# Altium PCB Janus.PcbDoc
Units mm, origin at the board's own origin, x right, y up, seen from the top; angles counter-clockwise.
Board outline 55 x 35 mm, 2 copper layers (Top Layer, Bottom Layer); 88 components, 54 nets, 312 pads, 95 vias.
Unrouted connection lines stored in the file: 149.
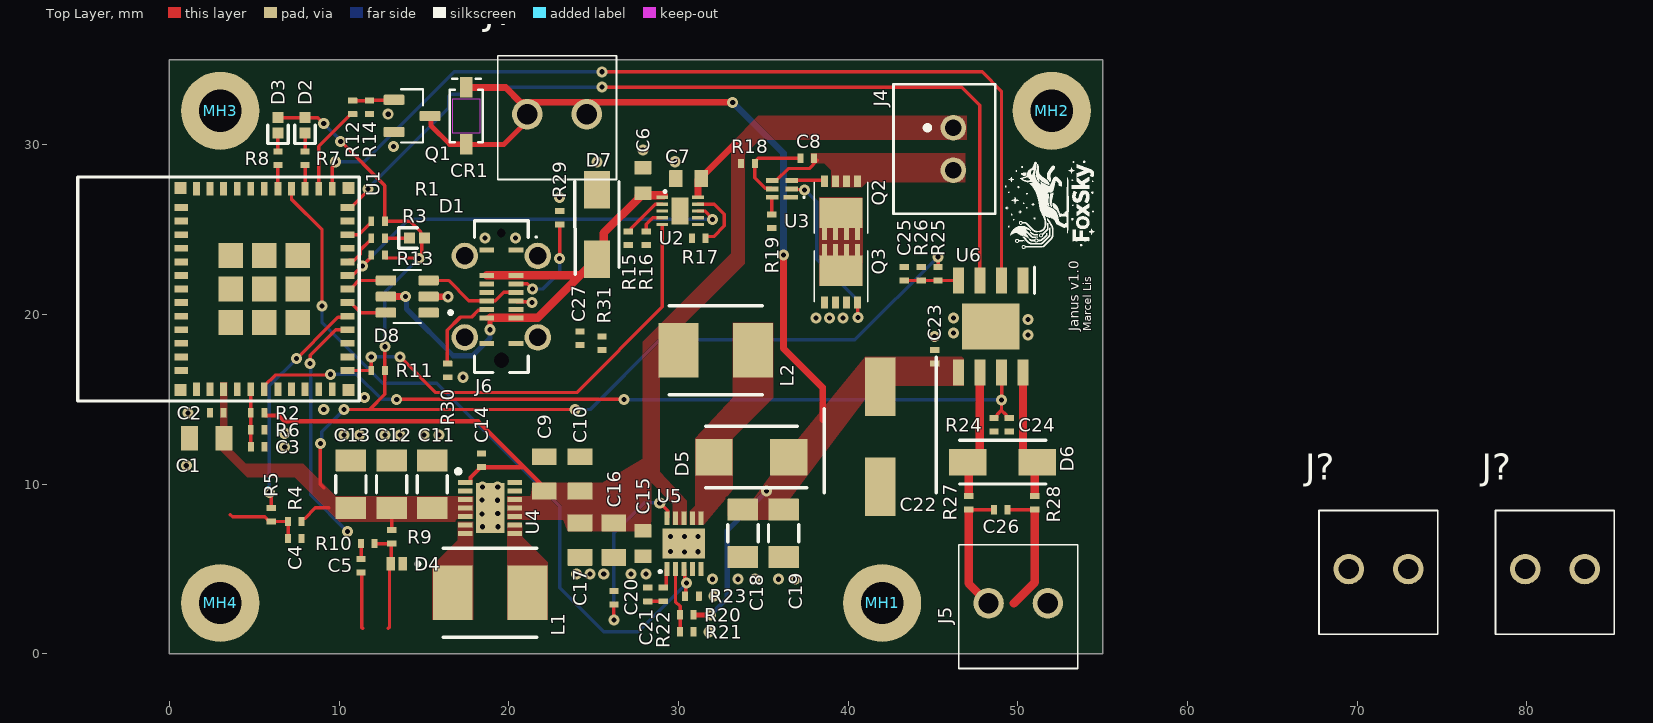
[diagram p0: Top Layer view]
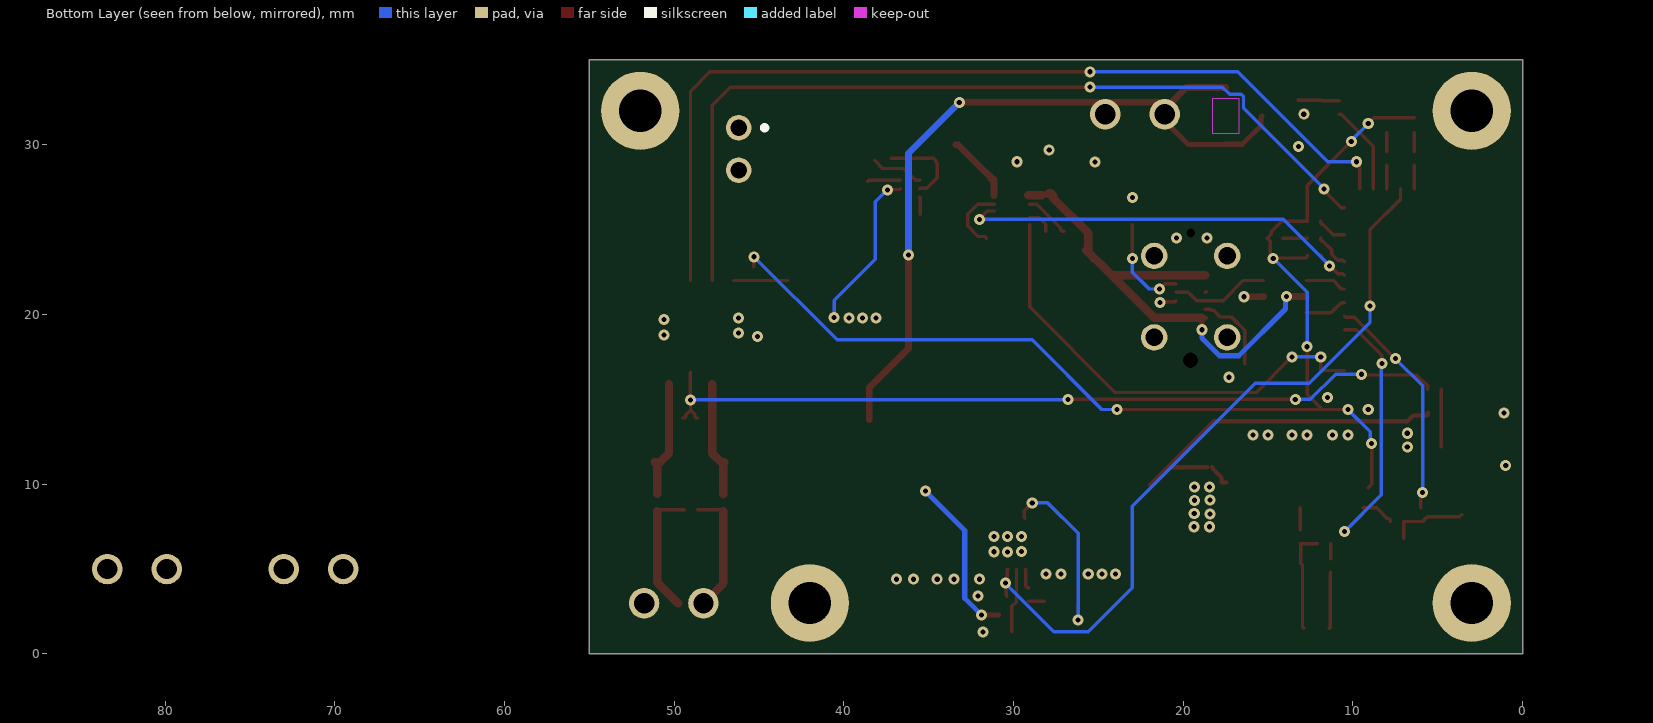
[diagram p1: Bottom Layer view, seen from below]
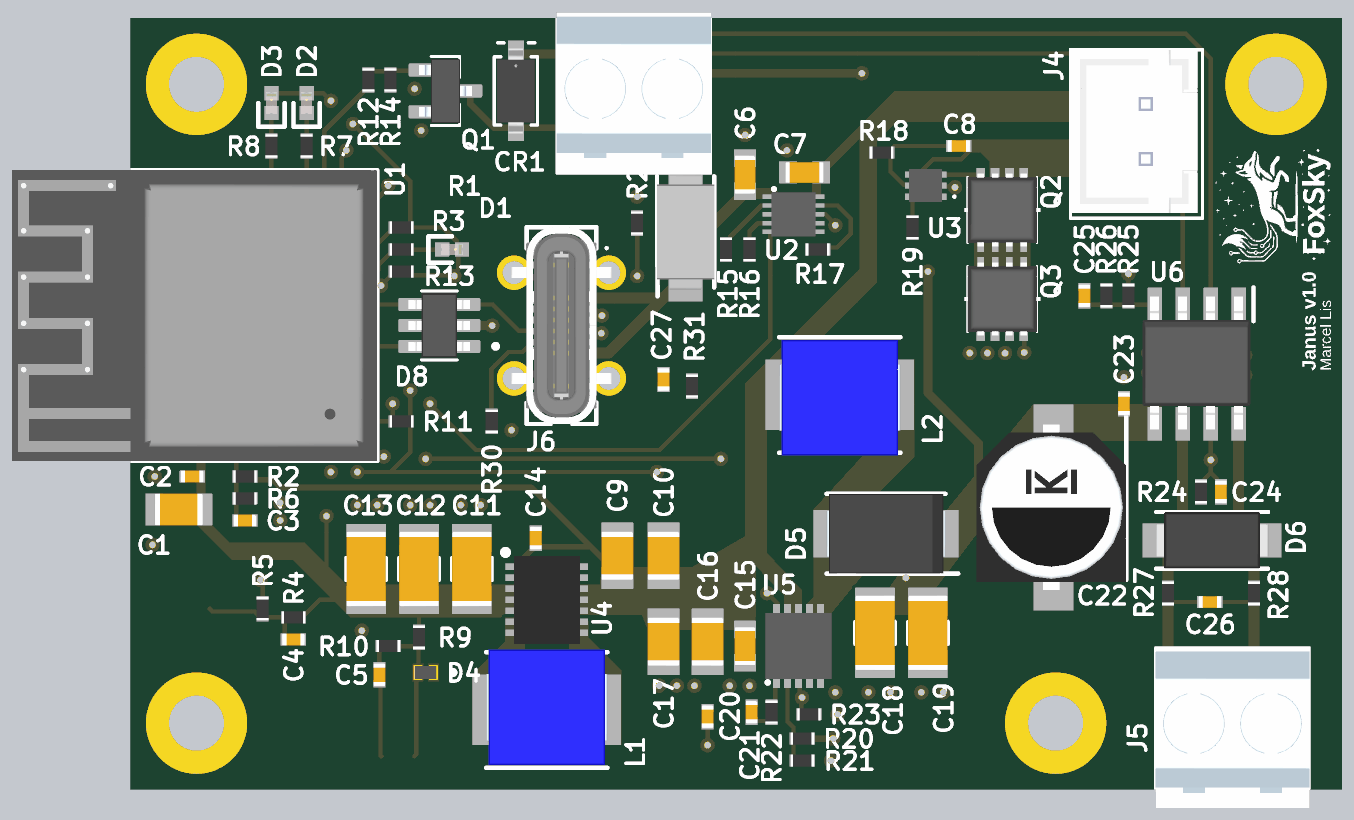
[diagram p2: 3D render of the assembled board from above, using the file's embedded part models]

## Layer stack, top to bottom
Top Solder: solder mask 0.0102, Solder Resist, Dk 3.5
Top Layer: signal copper 0.0356
Dielectric 1: dielectric 0.32, FR-4, Dk 4.8
Bottom Layer: signal copper 0.0356
Bottom Solder: solder mask 0.0102, Solder Resist, Dk 3.5

## Board outline
0,0 0,35 55,35 55,0

## Design rules (kind name [scope] priority, off if disabled: settings)
Clearance [All] p1: gap=0.15 ignorepadtopadclearanceinfootprint=TRUE
ComponentClearance [All] p1: gap=0.01 collisioncheckmode=3 verticalgap=0.01 showdistances=FALSE
DiffPairsRouting [All] p1: maxlimit=0.254 minlimit=0.254 mostfreqgap=0.254 toplayer_minwidth=0.381 toplayer_maxwidth=0.381 toplayer_prefwidth=0.381 bottomlayer_minwidth=0.381 bottomlayer_maxwidth=0.381 bottomlayer_prefwidth=0.381 maxuncoupledlength=12.7
PolygonConnect [All] p1: connectstyle=Direct reliefconductorwidth=0.254 reliefentries=4 polygonreliefangle="90 Angle" airgapwidth=0.254
RoutingVias [All] p1: holewidth=0.3 width=0.65 viastyle="Through Hole" minholewidth=0.3 minwidth=0.65 maxholewidth=0.3 maxwidth=0.65
SilkToSilkClearance [All] p1: silktosilkclearance=0.15
SolderMaskExpansion ViaTenting [IsVia] p1: expansion=0 istentingtop=TRUE
SolderMaskExpansion [All] p2: expansion=0 istentingtop=FALSE
SupplyNets "Schematic Supply Nets_5" [InNet('+3V3')] p1: voltage=0.000
SupplyNets "Schematic Supply Nets_4" [InNet('CELL-')] p2: voltage=0.000
SupplyNets "Schematic Supply Nets_3" [InNet('GND')] p3: voltage=0.000
SupplyNets "Schematic Supply Nets_2" [InNet('+12V')] p4: voltage=0.000
SupplyNets "Schematic Supply Nets_1" [InNet('CELL+')] p5: voltage=0.000
SupplyNets "Schematic Supply Nets" [InNet('+V_USB')] p6: voltage=0.000
Width [All] p1: maxlimit=0.6 minlimit=0.2 preferedwidth=0.2 minimp=50.000000 maximp=50.000000 favimp=50.000000
27 further rules are at their usual default settings.

## Classes and differential pairs
component class FoxSky.Janus: MH1 MH2 MH3 MH4
component class USBC_CONNECTOR: C27 D7 D8 J6 R29 R30 R31
component class POWER_SUPPLY: C9 C10 C11 C12 C13 C14 C15 C16 C17 C18 C19 C20 C21 D5 L1 L2 R20 R21 R22 R23 U4 U5
component class POWER_CELL_PROTECTION_AND_CHARGING: C6 C7 C8 J4 Q2 Q3 R15 R16 R17 R18 R19 U2 U3
component class MOTOR_DRIVER: C22 C23 C24 C25 C26 D6 J5 R24 R25 R26 R27 R28 U6
component class MCU: C1 C2 C3 C4 C5 CR1 D1 D2 D3 D4 J? Q1 R1 R2 R3 R4 R5 R6 R7 R8 R9 R10 R11 R12 R13 R14 U1
differential pair USB: +USB_P -USB_N

## Components (designator, comment, footprint, x,y, rotation, side; value= is the part's Value field where it differs from the comment)
C1 "10u" C0805 2.2,12.7 r0 top
C2 "100n" C0402 2.8,14.2 r0 top
C3 "100n" C0402 5.2,12.2 r180 top
C4 "100n" C0402 7.4,6.8 r180 top
C5 "10n" C0402 11.3,5.2 r90 top
C6 "1u" C0603 27.9,27.9 r270 top
C7 "1u" C0603 30.6,28 r0 top
C8 "100n" C0402 37.6,29.2 r180 top
C9 "10u" C0805 22.1,10.6 r270 top
C10 "10u" C0805 24.2,10.6 r270 top
C11 "22u" C1206 15.5,10 r270 top
C12 "22u" C1206 13.1,10 r270 top
C13 "22u" C1206 10.7,10 r270 top
C14 "100n" C0402 18.4,11.4 r270 top
C15 "1u" C0603 27.9,6.5 r90 top
C16 "10u" C0805 26.2,6.7 r90 top
C17 "10u" C0805 24.2,6.7 r90 top
C18 "22u" C1206 33.8,7.1 r90 top
C19 "22u" C1206 36.2,7.1 r90 top
C20 "100n" C0402 26.2,3.3 r270 top
C21 "1n2" C0402 28.2,3.5 r270 top
C22 "100u" CAPAE660X800N 41.9,12.8 r270 top
C23 "100n" C0402 45.1,17.5 r270 top
C24 "10n" C0402 49.5,13.5 r90 top
C25 "100n" C0402 43.3,22.4 r270 top
C26 "100n" C0402 49,8.5 r180 top
C27 "10n" C0402 24.2,18.6 r270 top
CR1 "1N4148W-E3-08" CR_48W-E3-08_VIS 17.5,31.7 r270 top
D1 "LED0402" LED0402 14.6,24.5 r0 top
D2 "LED0402" LED0402 8,31.15 r90 top
D3 "LED0402" LED0402 6.4,31.15 r90 top
D4 "PESD5V0V1BL_315" DIO_PESD5V0S1UL,315 13.4,5.3 r180 top
D5 "SS24-E3_52T" DIOM5436X244N 34.3,11.6 r180 top
D6 "SMAJ15CA" DIONM5126X265N 49.1,11.3 r180 top
D7 "SMAJ5.0A" DIOM5026X229N 25.2,25.3 r90 top
D8 "USBLC6-2SC6" SOT95P280X145-6N 14.022,21.054 r180 top
J4 "B2B-XH-A" CONN_B2B-XH-A_JST 46.2,31 r90 top
J5 "1546551-2" 15465512 48.274,2.983 r0 top
J6 "USB4215-03-A" USB496000C 19.565,21.05 r270 top locked
J? "1546551-2" 15465512 69.5,5 r0 top
J? "1546551-2" 15465512 21.1,31.8 r0 top
J? "1546551-2" 15465512 79.9,5 r0 top
L1 "SRP5030WA-1R5M" INDPM5552X300N 18.9,3.6 r180 top
L2 "SRP5030WA-3R3M" INDPM5552X300N 32.2,17.9 r0 top
MH1 "M2 Plated Hole" "M2 Plated Hole"#1 54.4,3.1 r0 top
MH2 "M2 Plated Hole" "M2 Plated Hole"#2 52.7,32 r0 top
MH3 "M2 Plated Hole" "M2 Plated Hole"#3 3,32.4 r0 top
MH4 "M2 Plated Hole" "M2 Plated Hole"#4 2.8,2.8 r0 top
Q1 "AO3400" SOT95P240X111-3N 14.3,31.7 r0 top
Q2 "CSD17581Q3A" CSD17581Q3A 39.575,26.447 r270 top
Q3 "CSD17581Q3A" CSD17581Q3A 39.575,22.102 r90 top
R1 "330R" R0402 12.3,24.5 r180 top
R2 "1M" R0402 5.2,14.2 r0 top
R3 "10k" R0402 12.3,25.5 r180 top
R4 "10k" R0402 7.4,7.8 r0 top
R5 "1k" R0402 6,8.2 r90 top
R6 "1M" R0402 5.2,13.2 r180 top
R7 "330R" R0402 8,29.2 r270 top
R8 "330R" R0402 6.4,29.2 r270 top
R9 "1M" R0402 13.1,6.9 r270 top
R10 "10k" R0402 11.7,6.5 r0 top
R11 "100k" R0402 12.3,16.7 r180 top
R12 "100R" R0402 10.8,32.2 r90 top
R13 "100k" R0402 12.3,23.5 r180 top
R14 "100k" R0402 11.8,32.2 r270 top
R15 "1k" R0402 27.042,24.5 r90 top
R16 "2k" R0402 28.1,24.5 r90 top
R17 "10k" R0402 31.2,24.5 r0 top
R18 "330R" R0402 34.1,28.9 r180 top
R19 "2k2" R0402 35.5,25.5 r90 top
R20 "158k" R0402 30.5,2.3 r0 top
R21 "18k" R0402 30.5,1.3 r180 top
R22 "68k" R0402 29.1,3.5 r90 top
R23 "100k" R0402 30.8,3.4 r180 top
R24 "2k87" R0402 48.6,13.5 r90 top
R25 "100k" R0402 45.3,22.4 r90 top
R26 "361k" R0402 44.3,22.4 r270 top
R27 "0R" R0402 47.1,8.9 r270 top
R28 "0R" R0402 51,8.9 r270 top
R29 "5k1" R0402 23,25.7 r270 top
R30 "5k1" R0402 16.4,16.7 r90 top
R31 "1M" R0402 25.5,18.3 r270 top
U1 "ESP32-C6-MINI-1-H8" ESP32C6MINI1H8 2.9,21.5 r90 top
U2 "BQ24040DSQT" SON40P200X200X80-11N 30.1,26.1 r0 top
U3 "BQ29728DSER" TPS610985DSET 36.1,27.4 r90 top
U4 "TPS63021DSJR" SON50P300X400X100-15N-D 18.9,8.6 r0 top
U5 "TPS61087DSCR" SON50P300X300X80-11N-D 30.325,6.499 r90 top
U6 "DRV8251ADDAR" SOIC127P600X170-9N 48.4,19.3 r270 top

## Footprints (in the part's own frame and the unit in brackets; to place one, negate y for a bottom-side part, rotate by r counter-clockwise, add the part's x,y. Pads: shape width x height; smd on the part's side, far side on the other; paste and mask are expansions set on the pad)
15465512 [mm]
  round 1.8 hole 1.2: 1(0,0) 2(3.5,0)
  silkscreen extent -1.75,-3.85 5.25,3.45, body extent -1.75,-3.85 5.25,3.45, height 8.51
C0402 [mm] "Generic 0402 SMD Ceramic Capacitor Footprint"
  rrect5% 0.355x0.55 smd: 1(-0.4,0) 2(0.4,0)
  body extent -0.53,-0.28 0.53,0.28, height 0.55
C0603 [mm] "Generic 0603 SMD Ceramic Capacitor Footprint"
  rrect5% 0.8x1 smd: 1(-0.75,0) 2(0.75,0)
  body extent -0.87,-0.48 0.87,0.48, height 0.95
C0805 [mm] "Generic 0805 SMD Ceramic Capacitor Footprint"
  rrect5% 1x1.45 smd: 1(-1.016,0) 2(1.016,0)
  body extent -1.1,-0.72 1.1,0.72, height 1.45
C1206 [mm] "Generic 1206 SMD Ceramic Capacitor Footprint"
  rrect5% 1.3x1.8 smd: 1(-1.4,0) 2(1.4,0)
  silkscreen extent -0.5,-0.89 0.5,0.89, body extent -1.7,-0.9 1.7,0.9, height 1.8
CAPAE660X800N [mm]
  rect 3.45x1.8 smd: 1(-2.95,0) 2(2.95,0)
  silkscreen extent -4.67,-3.3 3.3,3.3, body extent -3.75,-3.5 3.75,3.3, height 8.01
CONN_B2B-XH-A_JST [mil]
  round 59 hole 39 paste-99999 mask+0: 1(0,0) 2(-98.43,0)
  silkscreen extent -200,-97 101,139, body extent -191,-88 101,138, height 276
CR_48W-E3-08_VIS [mil]
  rect 47.56x28.36 smd paste+0 mask+0: 1(-66,0) 2(66,0)
  Keep-Out Layer region: -40.22,-31.5 -40.22,31.5 40.22,31.5 40.22,-31.5
  silkscreen extent -86,-39 61,39, body extent -76,-34 76,34, height 53
CSD17581Q3A [mm]
  rect 0.7x0.4 smd: 1(-1.402,0.975) 2(-1.402,0.325) 3(-1.402,-0.325) 4(-1.402,-0.975)
  rect 0.685x0.3 smd: 5(1.706,-0.975) 6(1.706,-0.325) 7(1.706,0.325) 8(1.706,0.975)
  rect 1.775x2.55 smd: 9(0.476,0)
  silkscreen extent -1.35,-1.58 1.65,1.58, body extent -1.5,-1.73 1.8,1.73, height 0.9
DIO_PESD5V0S1UL,315 [mm]
  rect 0.5x0.8 smd paste-0.1 mask+0: A(0.35,0) K(-0.35,0)
  silkscreen extent -1.35,-0.1 -1.15,0.1, body extent -0.49,-0.29 0.49,0.29, height 0.5
DIOM5026X229N [mm]
  rect 2.2x1.55 smd: 1(-2.05,0) 2(2.05,0)
  silkscreen extent -2.92,-1.3 2.52,1.3, body extent -2.61,-1.3 2.61,1.3, height 2.33
DIOM5436X244N [mm]
  rect 2.2x2.15 smd: 1(-2.2,0) 2(2.2,0)
  silkscreen extent -3.27,-1.81 2.7,1.81, body extent -2.7,-1.81 2.7,1.81, height 2.44
DIONM5126X265N [mm]
  rect 2.2x1.55 smd: 1(-2.05,0) 2(2.05,0)
  silkscreen extent -2.54,-1.29 2.54,1.29, body extent -2.55,-1.28 2.55,1.28, height 2.34
ESP32C6MINI1H8 [mm]
  rect 0.8x0.4 smd: 1(-5.9,1.3) 2(-5.9,0.5) 3(-5.9,-0.3) 4(-5.9,-1.1) 5(-5.9,-1.9) 6(-5.9,-2.7) 7(-5.9,-3.5) 8(-5.9,-4.3) 9(-5.9,-5.1) 10(-5.9,-5.9) 11(-5.9,-6.7) 25(5.9,-6.7) 26(5.9,-5.9) 27(5.9,-5.1) 28(5.9,-4.3) 29(5.9,-3.5) 30(5.9,-2.7) 31(5.9,-1.9) 32(5.9,-1.1) 33(5.9,-0.3) 34(5.9,0.5) 35(5.9,1.3)
  rect 0.4x0.8 smd: 12(-4.8,-7.6) 13(-4,-7.6) 14(-3.2,-7.6) 15(-2.4,-7.6) 16(-1.6,-7.6) 17(-0.8,-7.6) 18(0,-7.6) 19(0.8,-7.6) 20(1.6,-7.6) 21(2.4,-7.6) 22(3.2,-7.6) 23(4,-7.6) 24(4.8,-7.6) 36(4.8,2.2) 37(4,2.2) 38(3.2,2.2) 39(2.4,2.2) 40(1.6,2.2) 41(0.8,2.2) 42(0,2.2) 43(-0.8,2.2) 44(-1.6,2.2) 45(-2.4,2.2) 46(-3.2,2.2) 47(-4,2.2) 48(-4.8,2.2)
  rect 1.45x1.45 smd: 49(0,-2.7) 54(-1.975,-2.7) 55(-1.975,-4.675) 56(0,-4.675) 57(1.975,-4.675) 58(1.975,-2.7) 59(1.975,-0.725) 60(0,-0.725) 61(-1.975,-0.725)
  rect 0.7x0.7 smd: 50(5.95,2.25) 51(5.95,-7.65) 52(-5.95,-7.65) 53(-5.95,2.25)
  silkscreen extent -6.6,-8.3 6.6,8.3, body extent -6.6,-8.3 6.6,8.3, height 2.55
INDPM5552X300N [mm]
  rect 2.35x3.2 smd: 1(-2.2,0) 2(2.2,0)
  silkscreen extent -2.75,-2.63 2.75,2.63, body extent -2.75,-2.75 2.75,2.5, height 3
LED0402 [mm] "LED, 2-Leads, Body 1.00x0.50mm, IPC Medium Density"
  rect 0.65x0.65 smd: A(0.45,0) K(-0.45,0)
  silkscreen extent -1.07,-0.6 0,0.6, body extent -0.5,-0.25 0.5,0.25, height 0.4
"M2 Plated Hole"#1 [mm]
  round 4.6 hole 2.5 mask+0: 1(-12.4,-0.1)
"M2 Plated Hole"#2 [mm]
  round 4.6 hole 2.5 mask+0: 1(-0.7,0)
"M2 Plated Hole"#3 [mm]
  round 4.6 hole 2.5 mask+0: 1(0,-0.4)
"M2 Plated Hole"#4 [mm]
  round 4.6 hole 2.5 mask+0: 1(0.2,0.2)
R0402 [mm] "Generic 0402 Resistor Footprint"
  rrect5% 0.35x0.55 smd: 1(-0.4,0) 2(0.4,0)
  body extent -0.53,-0.28 0.53,0.28, height 0.37
SOIC127P600X170-9N [mm]
  rect 1.525x0.65 smd: 1(-2.712,1.905) 2(-2.712,0.635) 3(-2.712,-0.635) 4(-2.712,-1.905) 5(2.712,-1.905) 6(2.712,-0.635) 7(2.712,0.635) 8(2.712,1.905)
  rect 2.71x3.4 smd: 9(0,0)
  silkscreen extent -3.47,2.58 -1.95,2.58, body extent -3.06,-2.46 2.96,2.44, height 1.57
SON40P200X200X80-11N [mm]
  rect 0.7x0.2 smd: 1(-1.05,0.8) 2(-1.05,0.4) 3(-1.05,0) 4(-1.05,-0.4) 5(-1.05,-0.8) 6(1.05,-0.8) 7(1.05,-0.4) 8(1.05,0) 9(1.05,0.4) 10(1.05,0.8)
  rect 1x1.6 smd: 11(0,0)
  silkscreen extent -0.9,1.13 -0.88,1.16, body extent -1,-1 1,1, height 0.8
SON50P300X300X80-11N-D [mm]
  rect 0.8x0.3 smd: 1(-1.5,1) 2(-1.5,0.5) 3(-1.5,0) 4(-1.5,-0.5) 5(-1.5,-1) 6(1.5,-1) 7(1.5,-0.5) 8(1.5,0) 9(1.5,0.5) 10(1.5,1)
  rect 1.75x2.5 smd: 11(0,0)
  silkscreen extent -1.68,1.37 -1.63,1.42, body extent -1.5,-1.5 1.5,1.5, height 0.8
SON50P300X400X100-15N-D [mm]
  rect 0.85x0.3 smd: 1(-1.45,1.5) 2(-1.45,1) 3(-1.45,0.5) 4(-1.45,0) 5(-1.45,-0.5) 6(-1.45,-1) 7(-1.45,-1.5) 8(1.45,-1.5) 9(1.45,-1) 10(1.45,-0.5) 11(1.45,0) 12(1.45,0.5) 13(1.45,1) 14(1.45,1.5)
  rect 1.68x2.95 smd: 15(0,0)
  silkscreen extent -2,2.03 -1.75,2.27, body extent -1.5,-2 1.5,2, height 1
SOT95P240X111-3N [mm]
  rrect25% 1.23x0.6 smd: 1(-1.06,0.95) 2(-1.06,-0.95) 3(1.06,0)
  silkscreen extent -0.65,-1.57 0.65,1.57, body extent -1.2,-1.45 1.2,1.45, height 1.11
SOT95P280X145-6N [mm]
  rrect25% 1.21x0.59 smd: 1(-1.255,0.95) 2(-1.255,0) 3(-1.255,-0.95) 4(1.255,-0.95) 5(1.255,0) 6(1.255,0.95)
  silkscreen extent -2.66,-1.57 0.81,1.57, body extent -1.4,-1.46 1.4,1.46, height 1.42
TPS610985DSET [mm]
  rect 0.28x0.85 smd: 1(-0.5,-0.525)
  rect 0.28x0.75 smd: 2(0,-0.575) 3(0.5,-0.575) 4(0.5,0.575) 5(0,0.575) 6(-0.5,0.575)
  silkscreen extent -0.55,-1.35 -0.45,-1.25, body extent -0.75,-0.75 0.75,0.75, height 0.79
USB496000C [mm]
  round 1.56 hole 1.04: 13(-2.4,2.15) 14(-2.4,-2.15) 15(2.4,2.15) 16(2.4,-2.15)
  rect 0.3x0.87 smd: A1/B12(-2.75,-0.865) A1/B12(-2.75,0.865) A4/B9(-1.25,0.865) A4/B9(-1.25,-0.865) A5(-0.75,0.865) A6(-0.25,0.865) A7(0.25,0.865) A8(0.75,0.865) B1/A12(2.75,-0.865) B1/A12(2.75,0.865) B4/A9(1.25,0.865) B4/A9(1.25,-0.865) B5(0.75,-0.865) B6(0.25,-0.865) B7(-0.25,-0.865) B8(-0.75,-0.865)
  round 0.26 hole 0.52 unplated: MH1(-3.75,0)
  round 0.445 hole 0.89 unplated: MH2(3.75,0)
  silkscreen extent -4.47,-1.58 4.47,2.1, body extent -4.47,-2.3 4.47,2.3, height 6.5

## Part data
C1 C9 C10 C16 C17: library part CMP-00025-5, "Generic 0805 SMD Ceramic Capacitor"
C2 C3 C4 C5 C8 C14 C20 C21 C23 C24 C25 C26 C27: library part CMP-00023-15, "Generic SMD 0402 Ceramic Capacitor"
C6 C7 C15: library part CMP-00024-8, "Generic 0603 SMD Ceramic Capacitor"
C11 C12 C13 C18 C19: library part CMP-00026-7, "Generic 1206 SMD Ceramic Capacitor"
C22: library part EDK107M025A9HAA, "Surface Mount, Aluminum Electrolytic", Manufacturer_Name="Yageo Group", Mouser Part Number=80-EDK107M025A9HAA, Datasheet Link=https://www.yageogroup.com/content/datasheet/asset/file/KEM_A4001_EDK, Geometry.Height=8mm, Manufacturer_Part_Number=EDK107M025A9HAA, Mouser Price/Stock=https://www.mouser.co.uk/ProductDetail/KEMET/EDK107M025A9HAA?qs=T9vdlufmP8yf8os%252BKCOQGA%3D%3D
CR1: "SWITCHING DIODE GENPURP SOD123_A", Manufacturer_Name=Vishay, Copyright="Copyright (C) 2026 Ultra Librarian. All rights reserved.", Manufacturer_Part_Number=1N4148W-E3-08
D1 D2 D3: library part CMP-021-000003-4
D4: "12.5V Clamp 4.8A (8/20µs) Ipp Tvs Diode Surface Mount DFN1006-2"
D5: "Schottky Diodes & Rectifiers 2.0 Amp 40 Volt", Manufacturer_Name=Vishay, Manufacturer_Part_Number=SS24-E3/52T, Mouser Part Number=625-SS24-E3, Datasheet Link=https://www.vishay.com/docs/88748/ss22.pdf, Geometry.Height=2.44mm, Mouser Price/Stock=https://www.mouser.co.uk/ProductDetail/Vishay-General-Semiconductor/SS24-E3-52T?qs=x2jpVgRnAtP8XbmaoIr%252Bng%3D%3D
D6: "TVS Diode Bi-Directional SMAJ15CA-TR 32.5V, 400W, SMA 2-Pin", Package="DO-214AB Taiwan Semiconductor Corporation", Availability="In Stock", Check_prices=https://www.snapeda.com/parts/SMCJ15CA%20V7G/Taiwan+Semiconductor/view-part/?ref=eda, MF="Taiwan Semiconductor", MP="SMCJ15CA V7G", Price=None, Purchase-URL="https://pricing.snapeda.com/search/part/SMCJ15CA V7G/?ref=eda", SnapEDA_Link=https://www.snapeda.com/parts/SMCJ15CA%20V7G/Taiwan+Semiconductor/view-part/?ref=snap
D7: "BOURNS - SMAJ5.0A - TVS Diode, TRANSZORB SMAJ Series, Unidirectional, 5 V, 9.2 V, DO-214AC (SMA), 2 Pins", Manufacturer_Name=Bourns, Mouser Part Number=652-SMAJ5.0A, Datasheet Link=https://detail.tmall.com/item.htm?id=548354020241&ali_refid=a3_430583_1006:1109983619:N:3Uw9kZ3UMDT/QL57nh1fXA==:ab063b49c94624768a940a913313feb0&ali_trackid=1_ab063b49c94624768a940a913313feb0&spm=a230r.1.14.1, Geometry.Height=2.29mm, Manufacturer_Part_Number=SMAJ5.0A, Mouser Price/Stock=https://www.mouser.co.uk/ProductDetail/Bourns/SMAJ5.0A?qs=A3H9pljuJ8RbLIvzFxDfUA%3D%3D
D8: "17V Clamp 5A (8/20Âµs) Ipp Tvs Diode Surface Mount SOT-23-6", Package="SOT-23-6 STMicroelectronics", Availability="In Stock", Check_prices=https://www.snapeda.com/parts/USBLC6-2SC6/STMicroelectronics/view-part/?ref=eda, MF=STMicroelectronics, MP=USBLC6-2SC6, Price=None, Purchase-URL=https://pricing.snapeda.com/search/part/USBLC6-2SC6/?ref=eda, SnapEDA_Link=https://www.snapeda.com/parts/USBLC6-2SC6/STMicroelectronics/view-part/?ref=snap
J4: "Description", Manufacturer_Name=JST, Copyright="Copyright (C) 2026 Ultra Librarian. All rights reserved.", Manufacturer_Part_Number=B2B-XH-A, RefDes=RefDes, Type=Type
J5 J? J? J?: "Body Features: Product Orientation Vertical", Manufacturer_Name="TE Connectivity", Mouser Part Number=571-1546551-2, Datasheet Link=https://www.te.com/commerce/DocumentDelivery/DDEController?Action=srchrtrv&DocNm=1-1773458-1_EURO_STYLE_QRG&DocType=Data%20Sheet&DocLang=English&PartCntxt=1546551-2&DocFormat=pdf, Geometry.Height=8.5mm, Manufacturer_Part_Number=1546551-2, Mouser Price/Stock=https://www.mouser.co.uk/ProductDetail/TE-Connectivity/1546551-2?qs=m%2FhmcwQ75LmjcSTRMY1QVQ%3D%3D
J6: "Description", Manufacturer_Name="Global Connector Technology", Copyright="Copyright (C) 2026 Ultra Librarian. All rights reserved.", Manufacturer_Part_Number=USB4215-03-A, RefDes=RefDes, Type=Type
L1: "Ind,5.5x5.25x2.8mm,1.5uH+/-20%,8.5A,shd", Manufacturer_Name=Bourns, Mouser Part Number=652-SRP5030WA-1R5M, Datasheet Link=https://g.componentsearchengine.com/Datasheets/0/17601778.pdf, Geometry.Height=3mm, Manufacturer_Part_Number=SRP5030WA-1R5M, Mouser Price/Stock=https://www.mouser.co.uk/ProductDetail/Bourns/SRP5030WA-1R5M?qs=9vOqFld9vZVU1hSpR6NGrg%3D%3D
L2: "Ind,5.5x5.25x2.8mm,3.3uH+/-20%,6A,shd", Manufacturer_Name=Bourns, Mouser Part Number=652-SRP5030WA-3R3M, Datasheet Link=https://www.bourns.com/docs/Product-Datasheets/SRP5030WA.pdf, Geometry.Height=3mm, Manufacturer_Part_Number=SRP5030WA-3R3M, Mouser Price/Stock=https://www.mouser.co.uk/ProductDetail/Bourns/SRP5030WA-3R3M?qs=9vOqFld9vZVo7qWb%252BEg6NA%3D%3D
MH1 MH2 MH3 MH4: library part CONN-00089-1, Manufacturer=Molex
Q1: "N-Channel 30 V 5.8A (Ta) 1.4W (Ta) Surface Mount SOT-23-3"
Q2 Q3: "30-V, N channel NexFET power MOSFET, single SON 3 mm x 3 mm, 4.7 mOhm", Manufacturer_Name="Texas Instruments", Mouser Part Number=595-CSD17581Q3A, Datasheet Link=https://www.ti.com/product/CSD17581Q3A?utm_source=google&utm_medium=cpc&utm_campaign=app-null-null-GPN_EN-cpc-pf-google-soas_en_cons&utm_content=CSD17581Q3A&ds_k=CSD17581Q3A&DCM=yes&gclsrc=aw.ds&gad_source=1&gad_campaignid=8753799319&gbraid=0AAAAAC068F0J1, Geometry.Height=0.9mm, Manufacturer_Part_Number=CSD17581Q3A, Mouser Price/Stock=https://www.mouser.co.uk/ProductDetail/Texas-Instruments/CSD17581Q3A?qs=%2FP2Ij7fVdhEBu0ceoVBClg%3D%3D
R1 R2 R3 R4 R5 R6 R7 R8 R9 R10 R11 R12 R13 R14 R15 R16 R17 R18 R19 R20 R21 R22 R23 R24 R25 R26 R27 R28 R29 R30 R31: library part CMP-00016-11, "Generic 0402 SMD Resistor"
U1: "8 MB (Quad SPI) , 13.2  16.6  2.4 , 3.0 ~ 3.6 V , 2.4 GHz , 2412 ~ 2484 MHz , 40C ~ 105C", Manufacturer_Name="Espressif Systems", Mouser Part Number=356-ESP32C6MINI1H8, Datasheet Link=https://www.mouser.ph/ProductDetail/Espressif-Systems/ESP32-C6-MINI-1-H8?qs=olJun0bQHM8q1UR%2FHSWi2A%3D%3D, Geometry.Height=2.55mm, Manufacturer_Part_Number=ESP32-C6-MINI-1-H8, Mouser Price/Stock=https://www.mouser.co.uk/ProductDetail/Espressif-Systems/ESP32-C6-MINI-1-H8?qs=olJun0bQHM8q1UR%2FHSWi2A%3D%3D
U2: "1A 1-Cell Li-Ion Battery Charger WSON10 Texas Instruments BQ24040DSQT, Battery Charge Controller, 1000mA, 10-Pin SON", Manufacturer_Name="Texas Instruments", Mouser Part Number=595-BQ24040DSQT, Datasheet Link=http://www.ti.com/lit/ds/symlink/bq24040.pdf, Geometry.Height=0.8mm, Manufacturer_Part_Number=BQ24040DSQT, Mouser Price/Stock=https://www.mouser.co.uk/ProductDetail/Texas-Instruments/BQ24040DSQT?qs=c7TMWs5treRrgyn%2F898iNQ%3D%3D
U3: "PCM IC", Arrow Part Number=BQ29707DSET, Manufacturer_Name="Texas Instruments", Mouser Part Number=595-BQ29707DSET, Arrow Price/Stock=https://www.arrow.com/en/products/bq29707dset/texas-instruments.html?utm_currency=USD&region=nac, Datasheet Link=http://www.ti.com/lit/ds/symlink/bq2970.pdf, Height=0.8mm, Manufacturer_Part_Number=BQ29707DSET, Mouser Price/Stock=https://www.mouser.co.uk/ProductDetail/Texas-Instruments/BQ29707DSET?qs=7z%252BmIopC6%2FK8PFHAGER5Bg%3D%3D
U4: "High Efficiency Single Inductor Buck-Boost Converter with 4A Switch", Manufacturer_Name="Texas Instruments", Mouser Part Number=595-TPS63021DSJR, Datasheet Link=http://www.ti.com/lit/gpn/tps63021, Geometry.Height=1mm, Manufacturer_Part_Number=TPS63021DSJR, Mouser Price/Stock=https://www.mouser.co.uk/ProductDetail/Texas-Instruments/TPS63021DSJR?qs=C44r%252BX3hXgL5uT9uesn8fg%3D%3D
U5: "Conv DC-DC 2.5V to 6V Non-Inv/Inv/Step Up/Step Down Single-Out 3V to 18.5V 3.2A 10-Pin WSON EP T/R", Manufacturer_Name="Texas Instruments", Mouser Part Number=595-TPS61087DSCR, Datasheet Link=http://www.ti.com/lit/gpn/tps61087, Geometry.Height=0.8mm, Manufacturer_Part_Number=TPS61087DSCR, Mouser Price/Stock=https://www.mouser.co.uk/ProductDetail/Texas-Instruments/TPS61087DSCR?qs=bS0R8qMSxJOWmsgAbsl9FQ%3D%3D
U6: "Motor Drives 48-V, 3.5-A H bridge motor driver with current regulation and current sense feedback", Manufacturer_Name="Texas Instruments", Mouser Part Number=595-DRV8251ADDAR, Datasheet Link=https://www.arrow.com/en/products/drv8251addar/texas-instruments?region=nac, Geometry.Height=1.7mm, Manufacturer_Part_Number=DRV8251ADDAR, Mouser Price/Stock=https://www.mouser.co.uk/ProductDetail/Texas-Instruments/DRV8251ADDAR?qs=MyNHzdoqoQKQYZTe%252B1jFCw%3D%3D

## Via types
v1: diameter 0.65, hole 0.3, Top Layer to Bottom Layer, tented both sides, 95 vias

## Nets (pads, with @x,y where several pads share a name; then routed paths per layer and width w, separated by ;. In a path a pad name is that pad's centre, name@x,y a point inside that pad or via, vN(x,y) a via of type N, cw(c..) or ccw(c..) an arc to the next point about the centre after c; other vN are vias at no path point)
+3V3: C1.2 C2.2 C11.2 C12.2 C13.2 D1.A D2.A D3.A R3.1 R4.2 R9.1 R11.1 R13.1 R25.2 U1.3 U4.3 U4.4 U4.5 | length 74.4
  Top Layer w0.2: D3.A D2.A 8.75,31.6 v1(9.1,31.25) ; R4.2 7.8,7.9 7.875,7.975 7.975,7.975 8.6,8.6 9.4,8.6 ; v1(8.9,12.4) 8.9,10 9.1,9.8 ; v1(10.1,30.2) 12.7,27.6 R3.1 14.187,25.5 14.825,24.862 14.825,24.725 D1.A 14.873,24.323 14.873,23.595 14.7,23.422 v1(14.7,23.3) 14.675,23.325 12.775,23.325 12.7,23.4 R13.1 ; v1(10.3,14.4) 11.8,14.4 ; v1(12.7,18.1) R11.1 12.7,15.3 11.8,14.4 ; R9.1 C12.2 ; v1(23.9,14.4) 11.8,14.4 ; R25.2 v1(45.3,23.4)
  Bottom Layer w0.2: v1(8.9,12.4) 8.986,12.486 8.986,13.086 v1(10.3,14.4) ; v1(9.1,31.25) 10.1,30.25 v1(10.1,30.2) ; v1(12.7,18.1) 12.7,21.3 v1(14.7,23.3) ; v1(23.9,14.4) 24.8,14.4 28.9,18.5 40.4,18.5 v1(45.3,23.4)
+12V: C18.2 C19.2 C22.1 C23.2 CR1.1 D5.1 J?.1@69.5,5 R20.2 U6.5 | length 46.6
  Top Layer w0.3: R20.2 v1(31.9,2.3)
  Top Layer w0.4: CR1.1 19.824,33.376 20.7,32.5 v1(33.2,32.5) ; v1(36.2,23.5) 36.2,18 38.5,15.7 38.5,13.8
  Bottom Layer w0.3: v1(31.9,2.3) 32.875,3.275 32.875,7.275 v1(35.2,9.6)
  Bottom Layer w0.4: v1(33.2,32.5) 36.2,29.5 v1(36.2,23.5)
+V_USB: C6.2 D7.1 D8.5 J6.A4/B9 J6.B4/A9 U2.1 | length 28.9
  Top Layer w0.3: J6.B4/A9@18.7,19.8 18.9,19.8 v1(18.9,19.1)
  Top Layer w0.4: D8.5 12.769,21.051 13.904,21.051 v1(13.907,21.049)
  Top Layer w0.5: J6.A4/B9@18.7,22.3 20.43,22.3 24.2,22.3 ; J6.B4/A9@18.9,19.8 20.43,19.8 21.7,19.8 24.2,22.3 ; D7.1@25,23.1 24.2,22.3 ; D7.1 D7.1@25.593,23.643 ; D7.1@25.725,23.775 D7.1@25.593,23.643 ; C6.2@27.65,26.9 27.65,27 27.8,27.15 C6.2 C6.2@27.95,27.1 ; C6.2@27.7,26.9 25.593,24.793 D7.1@25.593,23.643 ; C6.2@28.327,27.036 29.148,27.036
  Bottom Layer w0.3: v1(13.907,21.049) 13.974,20.982 13.974,20.326 16.73,17.57 17.862,17.57 18.898,18.606 18.898,19.098 v1(18.9,19.1)
BUTTON: R5.2 U1.16 | length 13.5
  Top Layer w0.2: v1(5.9,9.5) 6,9.4 R5.2 ; v1(7.5,17.4) 9.55,19.45 9.938,19.838 10.438,19.838 U1.16
  Bottom Layer w0.2: v1(5.9,9.5) 5.9,15.8 v1(7.5,17.4)
CELL+: C7.2 C9.2 C10.2 C14.2 C15.2 C16.2 C17.2 J4.1 L2.1 R2.2 R18.2 U2.10 U4.1 U4.10 U4.11 U4.12 U5.8 U5.9 | length 25.7
  Top Layer w0.254: R2.2 5.6,14.1 5.648,14.052 6.448,14.052 6.8,13.7 18.2,13.7 20.9,11 ; U4.1 17.725,10.1 17.748,10.123 17.748,10.398 18.252,10.902 18.252,10.95 C14.2@18.302,11 ; C14.2@18.593,11 20.9,11 ; C9.2@21.939,9.961 20.9,11
  Top Layer w0.4: 31.15,27.013 C7.2@31.15,27.95 ; C7.2 31.35,28.1 31.55,28.3 31.582,28.3 33.282,30 33.4,30
CELL-: C8.1 J4.2 Q2.1 Q2.2 Q2.3 U3.4 | length 3.2
  Top Layer w0.2: U3.4 35.76,27.9 36.46,28.6 37.7,28.6 38.189,29.089
CHG_STAT: R13.2 U1.19 U2.8 | length 24.8
  Top Layer w0.2: U1.19 10.6,22.4 10.901,22.4 11.825,23.324 11.825,23.425 R13.2 ; U2.8 31.554,26.1 32,25.654 v1(32,25.6)
  Bottom Layer w0.2: v1(11.374,22.86) 14.114,25.6 v1(32,25.6)
COUT: Q3.4 U3.2 | length 10.5
  Top Layer w0.2: U3.2 36.713,27.363 37.393,27.363 v1(37.43,27.325) ; Q3.4 40.575,20.675 v1(40.575,19.825)
  Bottom Layer w0.2: v1(37.43,27.325) 37.475,27.325 38.15,26.65 38.15,23.25 40,21.4 40.575,20.825 v1(40.575,19.825)
DOUT: Q2.4 U3.3 | length 1.9
  Top Layer w0.2: U3.3 38.549,27.9 Q2.4
GND: C1.1 C2.1 C3.1 C4.1 C5.1 C6.1 C7.1 C9.1 C10.1 C11.1 C12.1 C13.1 C14.1 C15.1 C16.1 C17.1 C18.1 C19.1 C20.1 C21.1 C22.2 C23.1 C24.1 C25.1 C27.1 D4.K D7.2 D8.2 J6.A1/B12 J6.B1/A12 J?.1@21.1,31.8 J?.2@83.4,5 MH1.1 MH2.1 MH3.1 MH4.1 Q1.2 Q3.1 Q3.2 Q3.3 R6.1 R14.2 R15.1 R16.1 R17.1 R19.1 R21.1 R23.1 R24.1 R26.1 R29.1 R30.1 R31.1 U1.1 U1.2 U1.11 U1.14 U1.36 U1.37 U1.38 U1.39 U1.40 U1.41 U1.42 U1.43 U1.44 U1.45 U1.46 U1.47 U1.48 U1.49 U1.50 U1.51 U1.52 U1.53 U1.54 U1.55 U1.56 U1.57 U1.58 U1.59 U1.60 U1.61 U2.3 U2.7 U2.11 U4.2 U4.13 U4.15 U5.4 U5.5 U5.11 U6.1 U6.9 | length 4.5
  Top Layer w0.2: C5.1 11.35,4.75 11.35,1.55 11.4,1.5
  Top Layer w0.4: D8.2 15.281,21.049 16.417,21.049 v1(16.422,21.045)
  other v1: 31.8,1.3 32.1,3.4 32,4.4 33.5,4.4 34.5,4.4 35.9,4.4 36.9,4.4 24,4.7 24.8,4.7 25.6,4.7 27.2,4.7 28.1,4.7 29.541,6.025 30.369,6.012 31.154,6.018 30.369,6.912 29.541,6.925 31.154,6.918 18.461,7.491 19.361,7.491 18.433,8.253 19.353,8.281 18.435,9.055 19.343,9.05 18.452,9.833 19.352,9.833 1,11.1 6.8,12.2 10.3,12.9 11.2,12.9 12.7,12.9 13.6,12.9 15,12.9 15.9,12.9 6.8,13 1.1,14.2 9.1,14.4 11.5,15.1 17.3,16.3 45.1,18.7 50.6,18.8 46.2,18.9 50.6,19.7 38.1,19.8 38.9,19.8 39.7,19.8 46.2,19.8 18.6,24.5 20.4,24.5 23,26.9 25.195,28.981 29.8,29 27.9,29.7 13.2,29.9 12.9,31.8
GPIO8: R3.2 U1.22 | length 1.8
  Top Layer w0.2: U1.22 11.154,24.7 11.779,25.325 11.825,25.325 11.9,25.4 R3.2
LED1: R1.2 U1.20 | length 2.2
  Top Layer w0.2: U1.20 10.6,23.2 10.901,23.2 11.254,23.553 11.254,23.8 11.779,24.325 11.825,24.325 11.9,24.4 R1.2
LED2: R7.2 U1.27 | length 1.4
  Top Layer w0.2: U1.27 R7.2
LED3: R8.2 U1.29 | length 1.4
  Top Layer w0.2: U1.29 R8.2
MCU_CLUTCH_EN: R12.1 U1.26 | length 5.3
  Top Layer w0.2: U1.26 8.8,29.9 10.7,31.8 R12.1
MOTOR_OUT1: D6.2 R27.1 U6.6 | length 6.7
  Top Layer w0.5: D6.2 47.1,11.25 R27.1@47.1,9.418 ; D6.2@47.24,11.3 47.765,11.825 U6.6@47.765,15.9
MOTOR_OUT2: D6.1 R28.1 U6.8 | length 7.1
  Top Layer w0.5: U6.8@50.305,15.9 50.305,11.825 50.83,11.3 D6.1 51,11.15 R28.1@51,9.439
NetC4_2: C4.2 J?.1@79.9,5 R4.1 R5.1 | length 4.6
  Top Layer w0.2: 3.6,8.2 3.729,8.071 5.629,8.071 5.9,7.8 R5.1 R4.1 C4.2
NetC8_2: C8.2 R18.1 U3.5 | length 4.9
  Top Layer w0.2: R18.1@34.5,28.822 34.5,28.056 35.116,27.44 35.485,27.44 U3.5 ; R18.1 34.575,28.975 34.575,29.083 34.692,29.2 C8.2
NetC20_2: C20.2 U5.10 | length 10.6
  Top Layer w0.2: v1(26.2,2) C20.2 ; v1(28.9,8.9) 29.375,8.425 29.375,8.049 U5.10
  Bottom Layer w0.2: v1(26.2,2) 26.2,7.1 28,8.9 v1(28.9,8.9)
NetC21_2: C21.2 R22.1 | length 0.9
  Top Layer w0.2: C21.2 R22.1
NetC24_2: C24.2 R24.2 U1.6 U6.7 | length 48.2
  Top Layer w0.2: U1.6 5.6,15.8 6.231,16.431 9.456,16.431 v1(9.5,16.475) ; v1(13.4,15) v1(26.8,15) ; R24.2 48.7,13.9 48.775,13.975 48.775,14.105 49.035,14.365 ; v1@49.035,14.951 49.035,14.365 ; U6.7 49.043,16.58 v1(49.043,14.95) ; C24.2 49.402,13.9 49.325,13.978 49.325,14.075 49.035,14.365
  Bottom Layer w0.2: v1(9.5,16.475) 11.025,16.475 12.506,14.994 12.894,14.994 12.9,15 v1(13.4,15) ; v1(26.8,15) 26.825,14.975 49.018,14.975 v1(49.043,14.95)
NetC25_2: C25.2 R25.1 R26.2 U6.4 | length 3.1
  Top Layer w0.2: C25.2 R26.2 ; R26.2@44.4,22 U6.4@46.483,22
NetC26_1: C26.1 J5.2 R28.2 | length 7.6
  Top Layer w0.2: C26.1 50.901,8.5 R28.2@51,8.401
  Top Layer w0.5: 49.774,2.983 51,4.209 R28.2@51,8.401
NetC26_2: C26.2 J5.1 R27.2 | length 7.5
  Top Layer w0.2: R27.2@47.1,8.414 47.186,8.5 C26.2
  Top Layer w0.5: R27.2@47.1,8.414 47.1,4.157 J5.1
NetC27_2: C27.2 J6.13 J6.14 J6.15 J6.16 R31.2
NetCR1_2: CR1.2 J?.2@73,5 Q1.3 | length 6.7
  Top Layer w0.3: Q1.3 15.425,31.635 15.425,31.126 16.52,30.031 CR1.2@17.5,30.031 ; CR1.2 19.724,30.024 20.7,31
NetD1_K: D1.K R1.1 | length 1.4
  Top Layer w0.2: R1.1 D1.K
NetD2_K: D2.K R7.1 | length 1.1
  Top Layer w0.2: R7.1 D2.K
NetD3_K: D3.K R8.1 | length 1.1
  Top Layer w0.2: R8.1 D3.K
NetD4_A: D4.A J?.2@24.6,31.8 R9.2 R10.2 | length 6.1
  Top Layer w0.2: R10.2 R9.2 13.075,6.475 13.075,5.325 D4.A 12.975,5.225 12.975,1.575 12.9,1.5
NetD5_2: D5.2 L2.2 U5.6 U5.7
NetD8_4: D8.4 U1.18 | length 2.5
  Top Layer w0.2: U1.18 10.7,21.5 10.8,21.6 10.8,21.646 11.158,22.004 D8.4
NetD8_6: D8.6 U1.17 | length 2.5
  Top Layer w0.2: U1.17 10.7,20.7 11.296,20.104 D8.6
NetJ6_A5: J6.A5 R29.2 | length 5.9
  Top Layer w0.2: J6.A5 21.1,21.8 v1(21.4,21.5) ; v1(23,23.3) R29.2
  Bottom Layer w0.2: v1(21.4,21.5) 22,21.5 23,22.5 v1(23,23.3)
NetJ6_B5: J6.B5 R30.2 | length 4.8
  Top Layer w0.2: R30.2@16.385,17.1 16.385,19.077 17.158,19.85 17.811,19.85 18.211,20.25 18.365,20.25 18.415,20.3 J6.B5
NetL1_1: L1.1 U4.8 U4.9
NetL1_2: L1.2 U4.6 U4.7
NetQ1_1: Q1.1 R12.2 R14.1 | length 2.5
  Top Layer w0.2: R12.2 R14.1 11.825,32.625 13.215,32.625 Q1.1
NetQ2_5: Q2.5 Q2.6 Q2.7 Q2.8 Q2.9 Q3.5 Q3.6 Q3.7 Q3.8 Q3.9
NetR15_2: R15.2 U2.2 | length 2.7
  Top Layer w0.2: R15.2 27.142,24.9 27.217,24.975 27.217,25.075 28.642,26.5 U2.2
NetR16_2: R16.2 U2.4 | length 1.5
  Top Layer w0.2: R16.2 28.1,25.316 28.484,25.7 U2.4
NetR17_2: R17.2 U2.9 | length 3.9
  Top Layer w0.2: U2.9 32.1,26.5 32.706,25.894 32.706,25.223 32.075,24.592 31.675,24.592 31.6,24.517 R17.2
NetR19_2: R19.2 U3.6 | length 1
  Top Layer w0.2: R19.2 35.5,26.875 U3.6
NetR20_1: R20.1 R21.2 U5.2 | length 3.8
  Top Layer w0.2: U5.2 29.825,3.075 30.1,2.8 R20.1 R21.2
NetR22_2: R22.2 U5.1 | length 1.3
  Top Layer w0.2: R22.2 29.2,3.9 29.275,3.975 29.275,4.512 29.275,4.949 U5.1
NetR23_2: R23.2 U1.28 U5.3 | length 43.4
  Top Layer w0.2: U1.28 7.2,26.8 9,25 v1(9,20.5) ; U5.3 30.375,4.949 30.375,4.395 30.484,4.286 v1(30.484,4.164) 30.442,4.122 30.442,3.442 R23.2
  Bottom Layer w0.2: v1(9,20.5) 9,19.5 12.564,15.936 15.764,15.936 23,8.7 23,3.9 25.6,1.3 27.62,1.3 v1(30.484,4.164)
NetU1_24: U1.24 U6.3 | length 51.4
  Top Layer w0.2: U1.24 10.7,26.3 11.7,27.3 v1(11.7,27.4) ; v1(25.5,33.4) 46.7,33.4 47.765,32.335 U6.3
  Bottom Layer w0.2: v1(11.7,27.4) 16.45,32.15 16.45,32.825 16.596,32.972 17.272,32.972 17.7,33.4 v1(25.5,33.4)
NetU1_25: U1.25 U6.2 | length 54.7
  Top Layer w0.2: U1.25 9.6,28.678 9.8,28.878 v1(9.8,29) ; v1(25.5,34.3) 47.9,34.3 49.035,33.165 U6.2
  Bottom Layer w0.2: v1(9.8,29) 11.487,29 16.787,34.3 v1(25.5,34.3)
REED: C5.2 R10.1 U1.15 | length 15
  Top Layer w0.2: v1(8.3,17.1) 8.3,17.6 9.8,19.1 U1.15 ; C5.2 R10.1
  Bottom Layer w0.2: v1(8.3,17.1) 8.325,17.075 8.325,9.375 v1(10.5,7.2)
USB_N: D8.1 J6.A7 J6.B7 | length 1.1
  Top Layer w0.2: J6.B7@18.65,21.35 J6.B7 ; J6.A7 20.48,20.75 21.325,20.75 v1(21.375,20.7)
USB_P: D8.3 J6.A6 J6.B6 | length 5.9
  Top Layer w0.2: D8.3 16.453,22.004 17.648,20.809 19.209,20.809 19.7,21.3 J6.A6
USB_PG: R11.2 U1.12 U2.5 | length 27.2
  Top Layer w0.2: U1.12 R11.2 v1(11.9,17.5) ; v1(13.6,17.5) 15.7,15.4 24,15.4 29.05,20.45 U2.5
  Bottom Layer w0.2: v1(11.9,17.5) v1(13.6,17.5)
VBAT_SENSE: C3.2 R2.1 R6.2 U1.5 | length 3.4
  Top Layer w0.2: C3.2 R6.2 R2.1 U1.5
pads on no net: J6.A8 J6.B8 J6.MH1 J6.MH2 U1.4 U1.7 U1.8 U1.9 U1.10 U1.13 U1.21 U1.23 U1.30 U1.31 U1.32 U1.33 U1.34 U1.35 U2.6 U3.1 U4.14

## Polygon pours and split planes (outlines as drawn)
+3V3 on Top Layer "+3V3_L01_P005" (solid, pour order 5): 17.9,7.8 17.9,9.3 9.8,9.3 7.9,11.2 4.5,11.2 3.4,12.3 3.4,16 3,16 3,12 4.6,10.4 7.4,10.4 7.8,10 10,7.8
CELL+ on Top Layer "CELL+_L01_P000" (solid, pour order 0): 47,30.3 47,31.7 34.7,31.7 33.1,30.1 33.1,23.6 27.9,18.4 27.9,11.491 25.5,10.093 21.408,10.093 21.304,9.304 19.9,9.3 19.9,7.9 23.219,7.901 23.491,7.227 28.366,7.227 28.4,8.3 28.4,10.116 29.669,8.813 29.669,7.608 30.478,7.608 30.484,9.032 28.9,10.72 28.9,18 33.9,23 33.9,29.4 34.8,30.3 36.6,30.3
NetD5_2 on Top Layer "NETD5_2_L01_P006" (solid, pour order 6): 31.499,7.599 30.68,7.599 30.68,8.395 31,8.714 31,12.7 33.2,15.1 33.2,19.5 35.6,19.5 35.6,15.1 33.2,12.7 33.2,9.678 32.399,8.699
+12V on Top Layer "+12V_L01_P007" (solid, pour order 7): 32.9,7.9 32.894,7.906 32.894,9.153 34.423,9.126 35.4,10.5 36.314,11.786 36.9,12.5 41,17.5 46.7,17.5 46.8,17.4 46.8,15.8 41.6,15.8 37.6,10.5 35.643,7.906
CELL- on Top Layer "CELL-_L01_P001" (solid, pour order 1): 46.9,27.8 41.1,27.8 40.8,27.5 39,27.5 39,28.5 38.6,28.9 37.8,28.9 37.8,29.5 41.1,29.5 46.9,29.5
NetL1_2 on Top Layer "NETL1_2_L01_P003" (solid, pour order 3): 17,7.8 17,6.7 15.5,5.2 15.5,2 17.9,2 17.9,7.8
NetL1_1 on Top Layer "NETL1_1_L01_P004" (solid, pour order 4): 19.9,2 22.3,2 22.3,5.4 20.8,6.9 20.8,7.8 19.9,7.8
NetQ2_5 on Top Layer "NETQ2_5_L01_P002" (solid, pour order 2): 38.3,26.9 38.3,21.7 40.842,21.7 40.855,24.297 40.842,26.9

## Silkscreen, mask and mechanical layers (free items; w line width, h text height)
Top Overlay:
  drawing of 46 lines, arcs and shapes, not listed
  text "Janus v1.0" at 53.8,19 h1 r90
  text "Marcel Lis" at 54.5,19 h0.8 r90
Mechanical 1:
  the board outline again, w0.254

## Text inside footprints (layer, text, board x,y; h text height)
CR1: Mechanical 13 "*" at 16.865,33.186 h1.27 r270